# Altium PCB PCB_Sensor.PcbDoc
Units mm, origin at the board's own origin, x right, y up, seen from the top; angles counter-clockwise.
Board outline 62.23 x 33.15 mm, 2 copper layers (Top Layer, Bottom Layer); 57 components, 39 nets, 206 pads, 21 vias.
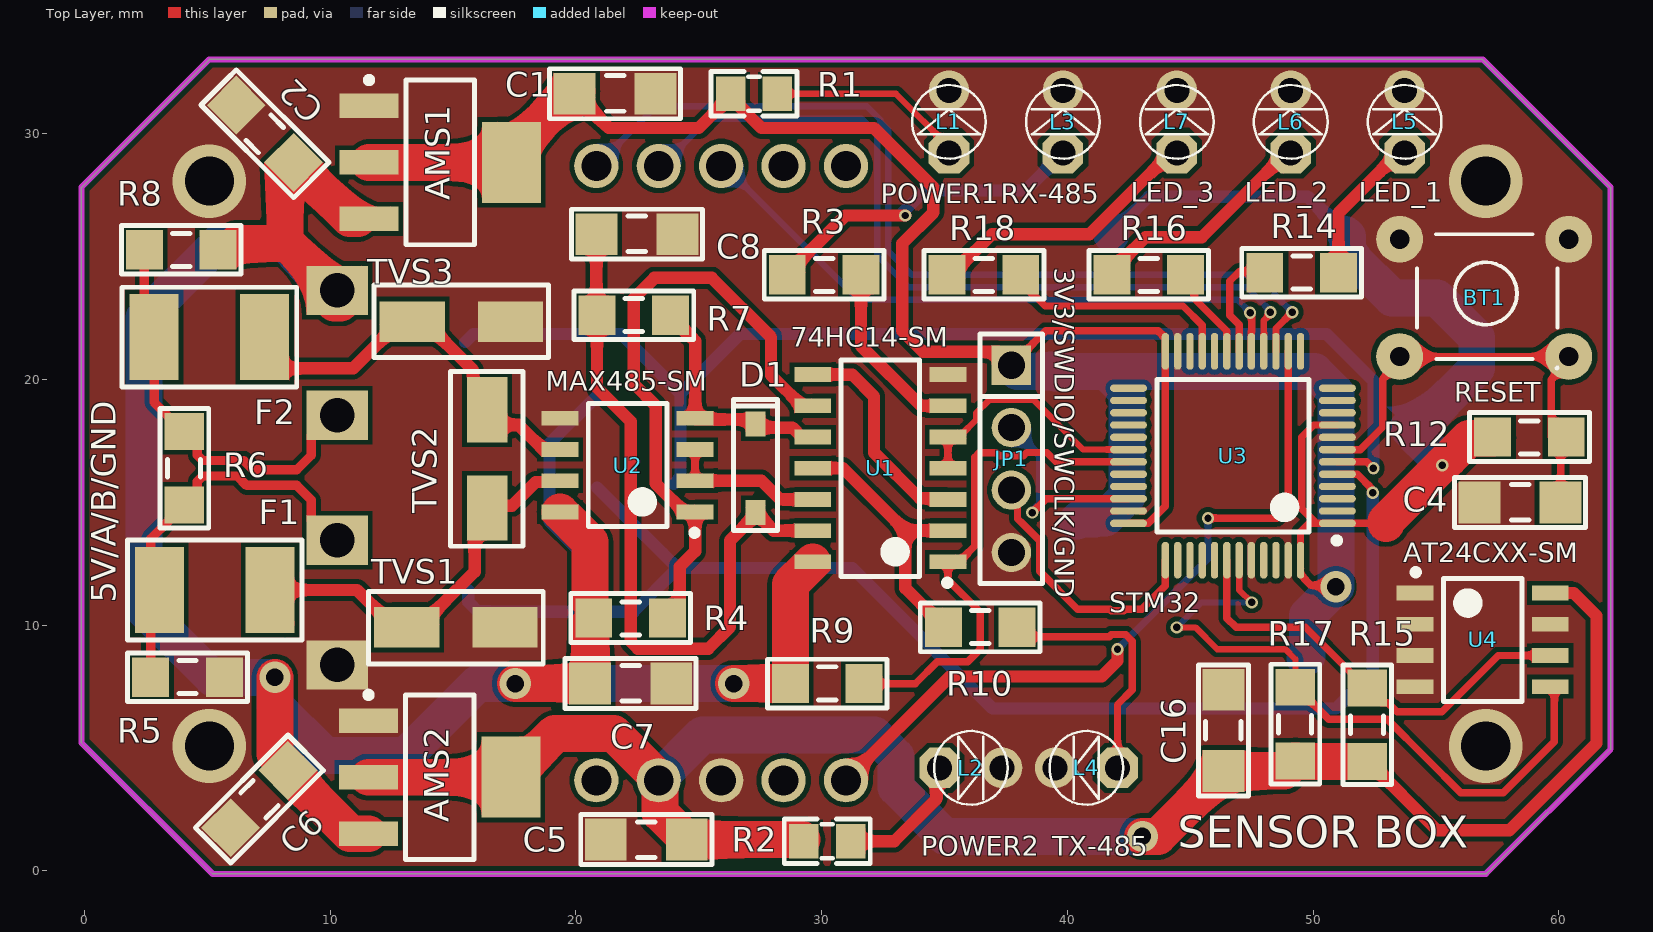
[diagram p0: Top Layer view]
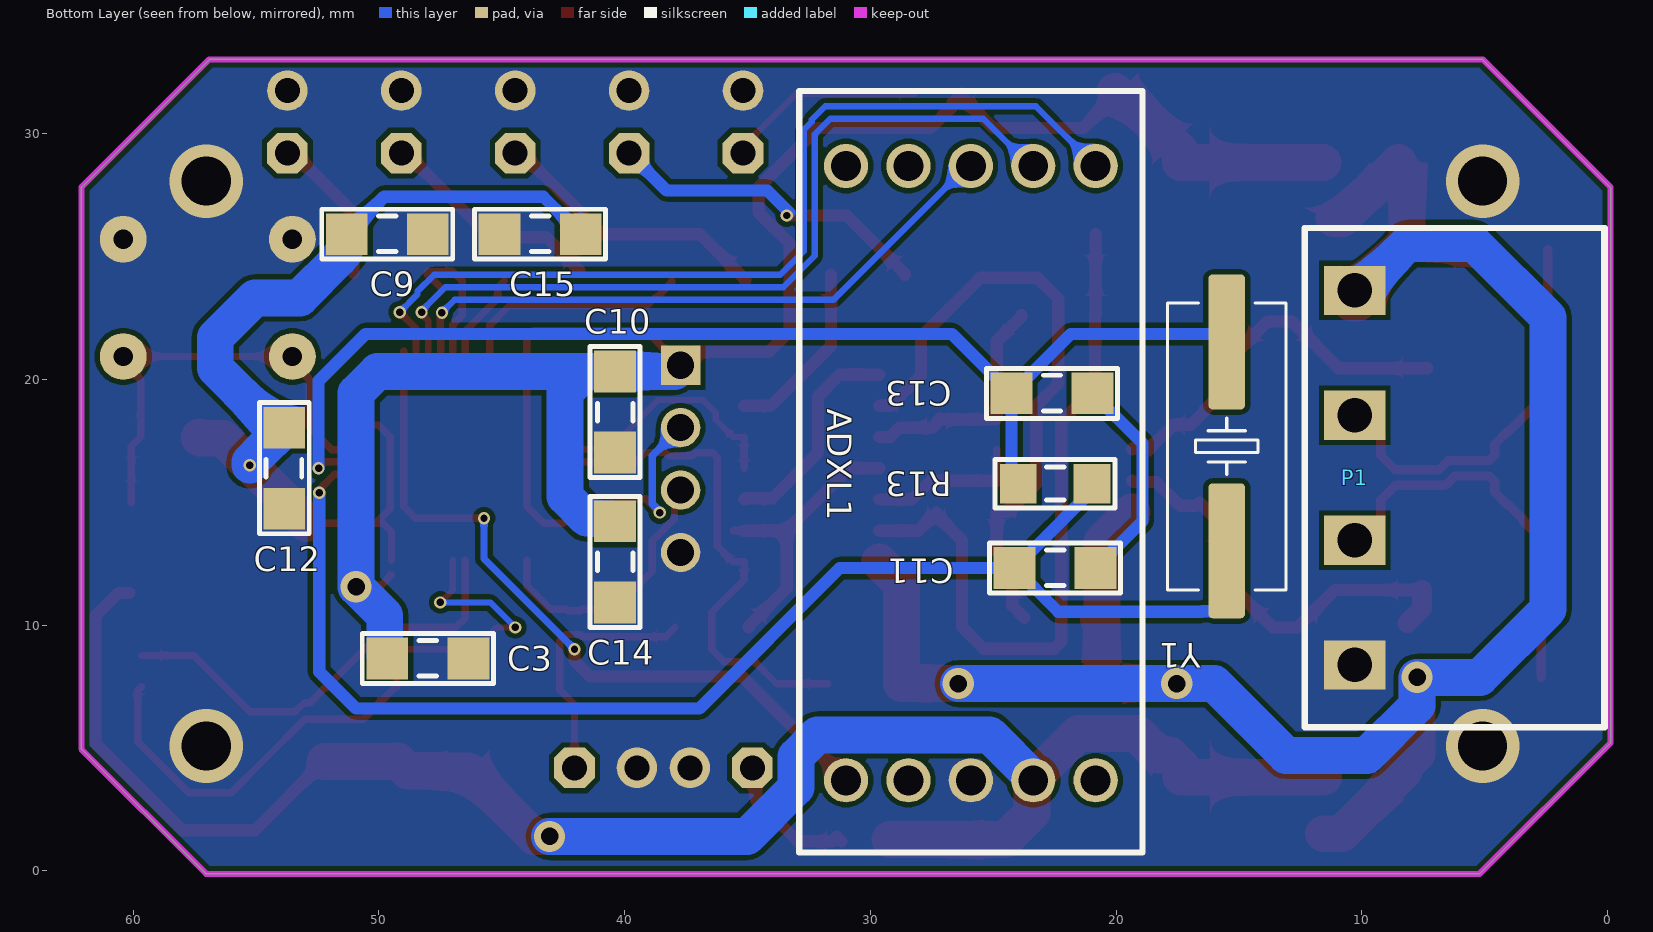
[diagram p1: Bottom Layer view, seen from below]

## Layer stack, top to bottom
Top Solder: solder mask 0.0102, Solder Resist, Dk 3.5
Top Layer: signal copper 0.0356
Dielectric 1: dielectric 0.32, FR-4, Dk 4.8
Bottom Layer: signal copper 0.0356
Bottom Solder: solder mask 0.0102, Solder Resist, Dk 3.5

## Board outline
-0.127,5.207 -0.127,27.813 5.08,33.02 56.896,33.02 62.103,27.813 62.103,4.953 57.023,-0.127 5.207,-0.127

## Design rules (kind name [scope] priority, off if disabled: settings)
Clearance Clearance_1 [All] p1: gap=0.2 ignorepadtopadclearanceinfootprint=FALSE
DiffPairsRouting [All] p1: maxlimit=0.254 minlimit=0.254 mostfreqgap=0.254 toplayer_minwidth=0.381 toplayer_maxwidth=0.381 toplayer_prefwidth=0.381 bottomlayer_minwidth=0.381 bottomlayer_maxwidth=0.381 bottomlayer_prefwidth=0.381 maxuncoupledlength=12.7
PlaneConnect [All] p1: planeconnectstyle=Direct reliefexpansion=0.508 reliefentries=4 reliefconductorwidth=0.254 reliefairgap=0.254
PolygonConnect [All] p1: connectstyle=Direct reliefconductorwidth=0.254 reliefentries=4 polygonreliefangle="90 Angle" airgapwidth=0.254
RoutingVias [All] p1: holewidth=0.5 width=0.8 viastyle="Through Hole" minholewidth=0.254 minwidth=0.5 maxholewidth=0.8 maxwidth=5
SolderMaskExpansion [All] p1: expansion=0.102 istentingtop=FALSE useseparateexpansions=TRUE expansionbottom=0.102 istentingbottom=FALSE
Width [InNetClass('All Nets')] p1: maxlimit=1.5 minlimit=0.254 preferedwidth=0.5
28 further rules are at their usual default settings.

## Classes and differential pairs
differential pair RS485: +RS485_P -RS485_N

## Components (designator, comment, footprint, x,y, rotation, side; value= is the part's Value field where it differs from the comment)
ADXL1 "TYPE2" ADXL345_TYPE_2 20.828,28.683 r270 bottom
AMS1 "AMS1117-3.3V" SOT223 14.478,28.829 r270 top value="AMS1117-3.3V SOT223"
AMS2 "AMS1117-3.3V" SOT223 14.457,3.81 r270 top value="AMS1117-3.3V SOT223"
BT1 "RESET" "Nut Nhan 4 Chan Cam 6x6" 53.848,25.908 r0 top
C1 "226" "tu 1206" 21.59,31.623 r0 top
C2 "226" "tu 1206" 7.342,29.996 r135 top
C3 "104" "tu 1206" 48.006,8.636 r180 bottom
C4 "105" "tu 1206" 58.42,14.986 r0 top
C5 "226" "tu 1206" 22.86,1.27 r180 top
C6 "226" "tu 1206" 7.112,2.921 r225 top
C7 "100nF" "tu 1206" 22.225,7.62 r0 top
C8 "100pF" "tu 1206" 22.479,25.908 r0 top
C9 "101" "tu 1206" 49.657,25.908 r180 bottom
C10 "104" "tu 1206" 40.386,18.669 r270 bottom
C11 "22pF" "tu 1206" 22.479,12.319 r180 bottom
C12 "104" "tu 1206" 53.848,16.383 r90 bottom
C13 "22pF" "tu 1206" 22.606,19.431 r180 bottom
C14 "104" "tu 1206" 40.386,12.573 r270 bottom
C15 "104" "tu 1206" 43.434,25.908 r180 bottom
C16 "104" "tu 1206" 46.355,5.715 r90 top
D1 "1N4148(T4)-SM" SOD123G_DO-215AD 27.305,16.383 r90 top
F1 "FUSE 1208" FUSE-CHIP-1812-SM 5.298,11.43 r180 top
F2 "FUSE 1208" FUSE-CHIP-1812-SM 5.08,21.717 r180 top
JP1 "3V3/SWDIO/SWCLK/GND" "JP 1x4 DT" 37.719,20.574 r270 top
L1 "POWER1" LED-3MM-RED 35.179,29.21 r90 top
L2 "POWER2" LED-3MM-RED 34.798,4.191 r0 top
L3 "RX-485" LED-3MM-RED 39.814,29.21 r90 top
L4 "TX-485" LED-3MM-RED 42.037,4.191 r180 top
L5 "LED_1" LED-3MM-RED 53.721,29.21 r90 top
L6 "LED_2" LED-3MM-RED 49.085,29.21 r90 top
L7 "LED_3" LED-3MM-RED 44.45,29.21 r90 top
P1 "5V/A/B/GND" "CON 4 4EDG5.08" 10.287,23.622 r270 bottom
R1 "220" "tro smd 0805" 27.248,31.562 r180 top
R2 "220" "tro smd 0805" 30.226,1.143 r180 top
R3 "1k" "tro smd 1206" 30.099,24.257 r180 top
R4 "4.7k" "tro smd 1206" 22.225,10.287 r180 top
R5 "4.7k" "tro smd 1206" 4.191,7.874 r0 top
R6 "120" "tro smd 1206" 4.064,16.383 r90 top
R7 "56k" "tro smd 1206" 22.352,22.606 r0 top
R8 "4.7k" "tro smd 1206" 3.937,25.273 r180 top
R9 "4.7k" "tro smd 1206" 30.226,7.62 r0 top
R10 "1k" "tro smd 1206" 36.449,9.906 r0 top
R12 "10k" "tro smd 1206" 58.801,17.653 r180 top
R13 "1M" "tro smd 1206" 22.479,15.748 r180 bottom
R14 "330R" "tro smd 1206" 49.53,24.334 r0 top
R15 "4.7k" "tro smd 1206" 52.197,5.945 r90 top
R16 "330R" "tro smd 1206" 43.307,24.257 r180 top
R17 "4.7k" "tro smd 1206" 49.276,5.969 r90 top
R18 "330R" "tro smd 1206" 36.6,24.257 r180 top
TVS1 "SMAJ6.5CA-SM" SMA-J_DO-214AC_TVS-BI 15.113,9.906 r0 top
TVS2 "SMAJ6.5CA-SM" SMA-J_DO-214AC_TVS-BI 16.383,16.764 r270 top
TVS3 "SMAJ6.5CA-SM" SMA-J_DO-214AC_TVS-BI 15.335,22.352 r180 top
U1 "74HC14-SM" SOIC14-1.27-150MIL 32.385,16.383 r180 top
U2 "MAX485-SM" SOIC8-1.27-150MIL 22.098,16.51 r180 top
U3 "STM32" LQFP48-0.5-7X7MM 46.736,16.891 r180 top
U4 "AT24CXX-SM" SOIC8-1.27-150MIL 56.896,9.398 r0 top
Y1 "8Mhz" "Thach Anh 2 chan SMD" 15.494,17.272 r270 bottom value=4Mhz

## Footprints (in the part's own frame and the unit in brackets; to place one, negate y for a bottom-side part, rotate by r counter-clockwise, add the part's x,y. Pads: shape width x height; smd on the part's side, far side on the other; paste and mask are expansions set on the pad)
ADXL345_TYPE_2 [mm]
  round 1.8 hole 1.219: 1(0,0) 2(0,-2.54) 3(0,-5.08) 4(0,-7.62) 5(0,-10.16) 6(25,-10.16) 7(25,-7.62) 8(25,-5.08) 9(25,-2.54) 10(25,0)
  silkscreen extent -3.05,-12.07 27.94,1.91
"CON 4 4EDG5.08" [mm]
  rect 2x2.5 hole 1.4: 1(0,0) 1(0,0) 2(5.08,0) 2(5.08,0) 3(10.16,0) 3(10.173,0) 4(15.24,0)
  silkscreen extent -2.54,-2.03 17.78,10.17, body extent -2.5,-1.75 17.74,10.25, height 3.15
FUSE-CHIP-1812-SM [mm]
  rect 2x3.5 smd: 1(-2.25,0) 2(2.25,0)
  silkscreen extent -3.56,-2.03 3.56,2.03, body extent -2.41,-1.61 2.41,1.61, height 1.32
"JP 1x4 DT" [mm] "4 pins, 1 row, straight, gold plating"
  rect 1.6x1.6 hole 1.1: 1(0,0)
  round 1.6 hole 1.1: 2(2.54,0) 3(5.08,0) 4(7.62,0)
  silkscreen extent -1.27,-1.27 8.89,1.27, body extent -1.27,-1.27 8.89,1.27, height 8.54
LED-3MM-RED [mil]
  oct 65x65 hole 40: 1(0,0)
  round 65 hole 40: 2(100,0)
  silkscreen extent -9,-59 109,59, body extent -27,-77 117,80, height 181
LQFP48-0.5-7X7MM [mm]
  oval 1.5x0.3 smd: 1(-4.25,2.75) 2(-4.25,2.25) 3(-4.25,1.75) 4(-4.25,1.25) 5(-4.25,0.75) 6(-4.25,0.25) 7(-4.25,-0.25) 8(-4.25,-0.75) 9(-4.25,-1.25) 10(-4.25,-1.75) 11(-4.25,-2.25) 12(-4.25,-2.75) 25(4.25,-2.75) 26(4.25,-2.25) 27(4.25,-1.75) 28(4.25,-1.25) 29(4.25,-0.75) 30(4.25,-0.25) 31(4.25,0.25) 32(4.25,0.75) 33(4.25,1.25) 34(4.25,1.75) 35(4.25,2.25) 36(4.25,2.75)
  oval 0.3x1.5 smd: 13(-2.75,-4.25) 14(-2.25,-4.25) 15(-1.75,-4.25) 16(-1.25,-4.25) 17(-0.75,-4.25) 18(-0.25,-4.25) 19(0.25,-4.25) 20(0.75,-4.25) 21(1.25,-4.25) 22(1.75,-4.25) 23(2.25,-4.25) 24(2.75,-4.25) 37(2.75,4.25) 38(2.25,4.25) 39(1.75,4.25) 40(1.25,4.25) 41(0.75,4.25) 42(0.25,4.25) 43(-0.25,4.25) 44(-0.75,4.25) 45(-1.25,4.25) 46(-1.75,4.25) 47(-2.25,4.25) 48(-2.75,4.25)
  silkscreen extent -4.35,-3.1 3.1,3.57, body extent -4.6,-4.6 4.6,4.6, height 1.6
"Nut Nhan 4 Chan Cam 6x6" [mil] "SW button 4pin, 250 x250 mil"
  round 75 hole 31: 1(-13,-8) 1(258,-8) 2(-13,-196) 2(258,-196)
  silkscreen extent 15,-215 240,0, body extent -31,-225 281,19, height 276
SMA-J_DO-214AC_TVS-BI [mm]
  rect 2.65x1.65 smd: 1(-2,0) 2(2,0)
  silkscreen extent -3.55,-1.49 3.56,1.46, body extent -2.8,-1.47 2.8,1.48, height 2.9
SOD123G_DO-215AD [mm]
  rect 1x0.8 smd: 1(-1.8,0) 2(1.8,0)
  silkscreen extent -2.54,-0.89 2.79,0.89, body extent -1.92,-0.85 1.93,0.85, height 1.35
SOIC8-1.27-150MIL [mm]
  rect 1.5x0.6 smd: 1(-2.75,1.905) 2(-2.75,0.635) 3(-2.75,-0.635) 4(-2.75,-1.905) 5(2.75,-1.905) 6(2.75,-0.635) 7(2.75,0.635) 8(2.75,1.905)
  silkscreen extent -2.85,-2.5 1.6,2.88, body extent -3.1,-2.5 3.1,2.5, height 1.75
SOIC14-1.27-150MIL [mm]
  rect 1.5x0.6 smd: 1(-2.75,3.81) 2(-2.75,2.54) 3(-2.75,1.27) 4(-2.75,0) 5(-2.75,-1.27) 6(-2.75,-2.54) 7(-2.75,-3.81) 8(2.75,-3.81) 9(2.75,-2.54) 10(2.75,-1.27) 11(2.75,0) 12(2.75,1.27) 13(2.75,2.54) 14(2.75,3.81)
  silkscreen extent -2.85,-4.4 1.6,4.78, body extent -3.1,-4.37 3.1,4.37, height 1.75
SOT223 [mm]
  rect 1x2.4 smd: 1(-2.3,-2.9) 2(0,-2.9) 3(2.3,-2.9)
  rect 3.3x2.4 smd: 4(0,2.9)
  silkscreen extent -3.47,-3.02 3.35,1.4, body extent -3.25,-3.56 3.25,3.4, height 1.68
"Thach Anh 2 chan SMD" [mm] "SMD Crystal HC49/US-SM package"
  round 0.508 on Mech15: 0(0,0)
  rrect25% 5.5x1.5 smd: 1(-4.25,0) 2(4.25,0)
  silkscreen extent -5.84,-2.41 5.84,2.41, body extent -6.4,-2.41 6.4,2.42, height 4.29
"tro smd 0805" [mm]
  rect 1.2x1.4 smd: 1(-0.946,-0.061) 2(0.954,-0.061)
  silkscreen extent -1.75,-0.97 1.75,0.84, body extent -1.56,-0.76 1.44,0.64, height 0.53
"tro smd 1206" [mm]
  rect 1.5x1.6 smd: 1(-1.5,0) 2(1.5,0)
  silkscreen extent -2.44,-0.99 2.44,0.99, body extent -1.6,-0.8 1.6,0.8, height 0.6
"tu 1206" [mm]
  rect 1.7x1.7 smd: 1(-1.65,0) 2(1.65,0)
  silkscreen extent -2.67,-1.02 2.67,1.02, body extent -1.57,-0.8 1.63,0.8, height 0.94

## Part data
ADXL1: library part ADXL345_TYPE_2
AMS1 AMS2: library part "AMS1117 SMD", "Dán", Chung_Loai=Dán, Don_Vi=Con, Ma_Hang=MH000596
BT1: library part "Nut Nhan 4 Chan Cam 6x6", "Nut Nhan 4 Chan 6x6mm", Ma_Hang=MH004584, Ten="Nút Nhấn 4 Chân 6x6x5MM DIP"
C1 C2 C5 C6: library part "Tu 1206 226 16V 20%", "Dán", Chung_Loai=Dán, Don_Vi=Con, Ma_Hang=MH004546, So_Chan=2, Ten_Linh_Kien="Tụ 1206 226-22uF 20% 16V"
C3 C9 C10 C12 C14 C15 C16: library part "Tu 1206 104 50V 20%", "Dán", Chung_Loai=Dán, Don_Vi=Con, Ma_Hang=MH004544, So_Chan=2, Ten_Linh_Kien="Tụ 1206 104-0.1uF 20% 50V"
C4: library part "Tu 1206 105 50V 20%", "Dán", Chung_Loai=Dán, Don_Vi=Con, Ma_Hang=MH004545, So_Chan=2, Ten_Linh_Kien="Tụ 1206 105-1uF 20% 50V"
C7 C8: library part "Tu 1206 4.7nF 50V", "Dán", Chung_Loai=Dán, Don_Vi=Con, Ma_Hang=MH007538, So_Chan=2, Ten_Linh_Kien="Tụ 1206 4.7nF 50V NPO"
C11 C13: library part "Tu 1206 22pF 50V 10%", "Dán", Chung_Loai=Dán, Don_Vi=Con, Ma_Hang=MH004547, So_Chan=2, Ten_Linh_Kien="Tụ 1206 22P 10% 50V"
D1: "Fast Switching Diode - Surface Mount"
F1 F2: library part FUSE-CHIP-SM, "Chip Fuses - Surface Mount"
JP1: library part "JP 1x4 2.54 Duc Thang", "Cắm", Chung_Loai=Cắm, Don_Vi=Con, Ma_Hang=MH000903, Ten_Linh_Kien="Jump Đơn Đực 2.54MM 1x40P Thẳng 11MM"
L1 L2 L3 L4 L5 L6 L7: library part "LED 3mm Do", "Cắm", Chung_Loai=Cắm, Don_Vi=Con, Ma_Hang=MH003892, Ten_Linh_Kien="Led 3MM Phủ Đỏ (10c)"
P1: library part "CON 4 EDG5.08", "Cắm", Chung_Loai=Cắm, Don_Vi=Con, Ma_Hang=MH000979, Ten_Linh_Kien="CON 4 2EDG5.08-4P 5.08MM ( Xanh Cong)"
R1 R2: library part "Tro 0805 5% 2.2k", "Dán", Chung_Loai=Dán, Don_Vi=Con, Ma_Hang=MH005237, So_Chan=2, Ten_Linh_Kien="Trở 0805 5% 2.2k"
R3 R10: library part "Tro 1206 1% 1k", "Dán", Chung_Loai=Dán, Don_Vi=Con, Ma_Hang=MH005880, So_Chan=2, Ten_Linh_Kien="Trở 1206 1% 1k"
R4 R5 R8 R9 R15 R17: library part "Tro 1206 5% 4.7K", "Dán", Chung_Loai=Dán, Don_Vi=Con, Ma_Hang=MH005908, So_Chan=2, Ten_Linh_Kien="Trở 1206 5% 4.7k"
R6: library part "Tro 1206 1% 220k", "Dán", Chung_Loai=Dán, Don_Vi=Con, Ma_Hang=MH005896, So_Chan=2, Ten_Linh_Kien="Trở 1206 1% 220K"
R7: library part "Tro 1206 5% 75k", "Dán", Chung_Loai=Dán, Don_Vi=Con, Ma_Hang=MH005920, So_Chan=2, Ten_Linh_Kien="Trở 1206 5% 75k"
R12: library part "Tro 1206 5% 10k", "Dán", Chung_Loai=Dán, Don_Vi=Con, Ma_Hang=MH005909, So_Chan=2, Ten_Linh_Kien="Trở 1206 5% 10K"
R13: library part "Tro 1206 5% 100K", "Dán", Chung_Loai=Dán, Don_Vi=Con, Ma_Hang=MH005921, So_Chan=2, Ten_Linh_Kien="Trở 1206 5% 100k"
R14 R16 R18: library part "Tro 1206 5% 300R", "Dán", Chung_Loai=Dán, Don_Vi=Con, Ma_Hang=MH005926, So_Chan=2, Ten_Linh_Kien="Trở 1206 5% 300R"
TVS1 TVS2 TVS3: "ESD Suppressors/TVS Diodes 6.5V Bi-Dir - Surface Mount"
U1: "Hex Inverting Schmitt Trigger - Surface Mount"
U2: "Low-Power, Slew-Rate-Limited RS-485/RS-422 Transceivers - Surface Mount"
U3: library part STM32F103C8T6-1-SM, "ARM Microcontrollers - MCU 32BIT Cortex M3 64KB 20KB RAM 2X12 ADC - Surface Mount"
U4: "Two-Wire Serial EEPROM - Surface Mount"
Y1: library part "Thach Anh 2 chan SMD", "Crystal For all Crystal 2pin."

## Via types
v1: diameter 0.5, hole 0.3, Top Layer to Bottom Layer, tented both sides, 12 vias
v2: diameter 1.27, hole 0.711, Top Layer to Bottom Layer, tented both sides, 5 vias
v3: diameter 3, hole 2, Top Layer to Bottom Layer, tented both sides, 4 vias

## Nets (pads, with @x,y where several pads share a name; then routed paths per layer and width w, separated by ;. In a path a pad name is that pad's centre, name@x,y a point inside that pad or via, vN(x,y) a via of type N, cw(c..) or ccw(c..) an arc to the next point about the centre after c; other vN are vias at no path point)
3V3_1: AMS1.2 AMS1.4 C1.1 C3.1 C9.1 C10.1 C12.2 C14.1 C15.2 JP1.1 R1.2 R12.2 U3.1 U3.9 U3.24 U3.36 U3.48 | length 130
  Top Layer w0.3: JP1.1 39.116,21.971 43.688,21.971 43.918,21.741 43.986,21.741 U3.24 43.986,14.834 43.293,14.141 U3.36 ; U3.48@49.486,12.041 49.908,11.619 50.865,11.619 v2(50.928,11.557) ; U3.48 49.486,13.799 49.828,14.141 50.121,14.141 ; U3.9 50.018,18.141 49.53,17.653 49.53,14.732 50.121,14.141 ; 52.959,14.141 U3.1 50.121,14.141
  Top Layer w0.5: C1.1 21.337,30.226 24.997,30.226 26.294,31.523 R1.2 26.644,31.273 26.644,31.141 27.051,30.734 27.051,30.721 27.546,30.226 32.131,30.226 34.544,27.813 34.544,26.797 33.274,25.527 33.274,21.971 34.121,21.124 37.169,21.124 JP1.1 ; v2(50.928,11.557) v2@51.045,11.675
  Top Layer w1.5: AMS1.2 AMS1.4 17.378,29.279 C1.1@19.468,31.369 ; C1.1 C1.1@20.04,31.723 ; 52.959,14.141 52.959,14.224 55.245,16.51 v1(55.251,16.51) 55.527,16.786 56.344,17.603 57.301,17.603 R12.2
  Bottom Layer w0.5: C15.2@41.784,26.036 41.912,26.036 43.308,27.432 49.783,27.432 C9.1
  Bottom Layer w1.5: JP1.1 37.974,20.319 C10.1 41.666,20.319 50.048,20.319 50.927,19.44 v2(50.928,11.557) ; C14.1 40.486,14.323 41.125,14.323 41.153,14.351 41.539,14.351 42.418,15.23 42.418,19.467 41.666,20.219 ; C15.2 C15.2@41.784,26.036 ; C3.1 49.756,8.736 49.756,10.385 v2(50.928,11.557) ; C9.1 51.407,25.808 51.407,25.169 51.615,24.96 51.615,24.917 53.215,23.317 55.042,23.317 56.656,21.703 56.656,20.461 54.328,18.133 53.948,18.133 C12.2 55.251,16.63 v1(55.251,16.51)
3V3_2: ADXL1.9 AMS2.2 AMS2.4 C5.1 C16.1 R2.2 R15.1 R17.1 U4.8 | length 73.6
  Top Layer w0.5: R2.2@29.205,1.27 R2.2 ; R15.1 52.247,4.445 55.041,1.651 57.985,1.651 61.526,5.192 61.526,10.381 60.604,11.303 U4.8@60.154,11.303
  Top Layer w1.5: AMS2.2 AMS2.4 17.357,4.26 17.807,4.71 18.257,4.71 19.135,5.588 21.539,5.588 23.368,3.759 ADXL1.9 23.425,3.626 23.425,2.355 C5.1 R2.2@29.205,1.27 ; v2(43.053,1.397) 43.687,1.397 C16.1 48.822,4.065 49.226,4.469 R17.1 49.326,4.469 49.35,4.445 R15.1
  Bottom Layer w1.5: ADXL1.9 23.368,3.759 25.142,5.533 32.144,5.533 33.022,4.654 33.022,3.385 35.01,1.397 v2(43.053,1.397)
5V: AMS1.3 AMS2.3 C2.1 C6.1 C7.1 P1.1 R4.2 R8.1 R9.1 U1.14 U2.8 | length 89.2
  Top Layer w1.5: R8.1 5.437,25.323 5.976,25.323 6.18,25.527 7.874,25.527 ; v2(7.747,7.874) 7.747,4.761 8.349,4.158 C6.1@8.328,4.137 ; 8.005,25.654 8.005,25.658 8.064,25.717 ; C6.1 8.279,4.04 10.809,1.51 AMS2.3 ; P1.1@9.787,23.995 8.064,25.717 ; P1.1@9.914,23.487 9.914,23.364 10.164,23.114 P1.1@10.414,23.114 ; AMS1.3@11.128,26.543 10.795,26.543 C2.1 8.509,28.688 8.155,28.334 8.155,25.808 8.064,25.717 ; v2(17.526,7.62) C7.1 20.575,7.719 20.574,7.72 20.574,10.086 20.725,10.237 R4.2@20.725,10.337 ; U2.8 20.574,13.379 R4.2@20.574,10.927 ; v2(26.416,7.62) R9.1 28.726,11.664 U1.14
  Bottom Layer w1.5: P1.1@9.954,23.437 10.139,23.622 10.287,23.622 10.037,23.622 8.132,25.527 5.426,25.527 2.413,22.514 2.413,10.642 5.181,7.874 v2(7.747,7.874) 7.747,6.731 9.779,4.699 13.081,4.699 16.002,7.62 v2(17.526,7.62) v2(26.416,7.62)
CS: ADXL1.6 U3.14 | length 30.2
  Top Layer w0.3: v1(45.72,14.351) 48.514,14.351 48.986,14.823 U3.14
  Top Layer w0.5: ADXL1.6 35.214,7.909 41.398,7.909 42.037,8.548 v1(42.037,9.017)
  Bottom Layer w0.3: v1(42.037,9.017) 45.72,12.7 v1(45.72,14.351)
GND: ADXL1.8 AMS1.1 AMS2.1 BT1.1 C1.2 C2.2 C3.2 C4.1 C5.2 C6.2 C7.2 C8.2 C9.2 C10.2 C12.1 C14.2 C15.1 C16.2 JP1.4 L1.2 L2.2 L3.2 L4.2 L5.2 L6.2 L7.2 P1.4 R5.2 TVS1.2 TVS3.1 U1.7 U2.5 U3.8 U3.23 U3.35 U3.44 U3.47 U4.1 U4.2 U4.3 U4.4 U4.7 | length 0
  Top Layer w0.254: U3.35@42.477,14.632 U3.35
  other v3: 5.08,5.08 57.023,5.08 5.08,28.067 57.023,28.067
LED1: R14.1 U3.18 | length 5.5
  Top Layer w0.3: U3.18 46.986,21.741 46.986,22.229 46.609,22.606 46.609,24.003 46.99,24.384 R14.1@48.006,24.384 ; R14.1@47.43,23.684 48.03,24.284 R14.1
LED2: R16.1 U3.19 | length 3.5
  Top Layer w0.3: R16.1@44.896,24.003 45.165,23.734 45.165,23.288 46.486,21.967 U3.19
LED3: R18.1 U3.21 | length 9.2
  Top Layer w0.3: R18.1@38.076,24.003 38.076,23.953 38.676,23.353 38.726,23.353 39.092,22.987 44.704,22.987 45.486,22.205 U3.21
MISO: ADXL1.2 U3.16 | length 33.6
  Top Layer w0.254: U3.16 47.986,22.392 48.26,22.666 v1(48.26,22.733)
  Bottom Layer w0.254: ADXL1.2 23.476,28.683 25.4,30.607 31.623,30.607 32.258,29.972 32.258,25.026 33.535,23.749 47.301,23.749 48.26,22.79 v1(48.26,22.733)
MOSI: ADXL1.3 U3.17 | length 25.5
  Top Layer w0.3: v1(47.433,22.709) 47.433,22.655 47.498,22.591 47.498,21.96 47.486,21.948 U3.17
  Bottom Layer w0.254: ADXL1.3 26.054,28.683 31.496,23.241 46.917,23.241 v1@47.389,22.768
NetC8_1: C8.1 D1.1 R7.1 U1.13 | length 29.4
  Top Layer w0.5: C8.1 20.829,22.629 R7.1 20.852,19.661 22.225,18.288 22.225,9.33 22.518,9.037 25.381,9.037 26.268,9.924 26.268,13.446 D1.1@27.305,14.483 ; D1.1 D1.1@27.305,14.483 ; U1.13 28.045,13.843 27.555,14.333 27.455,14.333 D1.1@27.305,14.483
NetC11_2: C11.2 C13.2 | length 8.7
  Bottom Layer w0.5: C11.2 18.923,14.225 18.923,17.398 C13.2
NetD1_2: D1.2 R7.2 U1.10 U2.4 | length 9.8
  Top Layer w0.5: R7.2 23.852,22.556 24.848,21.56 U2.4 24.898,18.365 27.155,18.365 27.155,18.415 27.305,18.265 D1.2 27.454,18.034 28.804,18.034 29.185,17.653 U1.10
NetF1_1: F1.1 TVS1.1 TVS2.2 U2.7 | length 17.8
  Top Layer w0.5: F1.1 11.089,11.43 12.613,9.906 TVS1.1 13.613,9.906 15.875,12.168 15.875,14.256 TVS2.2 16.605,14.986 16.732,14.859 17.399,14.859 18.365,15.825 19.298,15.825 U2.7
  Top Layer w0.8: F1.1 7.548,10.68 F1.1@8.148,10.08
NetF2_1: F2.1 TVS2.1 TVS3.2 U2.6 | length 15.6
  Top Layer w0.5: F2.1@7.33,20.447 10.93,20.447 12.835,22.352 TVS3.2 13.835,22.352 15.479,20.708 15.808,20.379 15.808,19.339 TVS2.1 16.383,18.724 16.958,18.149 17.665,18.149 18.619,17.195 19.298,17.195 U2.6
NetL1_1: L1.1 R1.1 | length 7.9
  Top Layer w0.254: R1.1 33.02,31.623 L1.1@35.179,29.464
NetL2_1: L2.1 R2.1 | length 5.7
  Top Layer w0.5: R2.1 31.365,1.397 31.365,1.361 31.522,1.204 32.954,1.204 34.671,2.921 34.671,4.064 L2.1
NetL3_1: L3.1 R3.2 | length 13.5
  Top Layer w0.5: R3.2 28.599,24.307 30.962,26.67 v1(33.401,26.67)
  Bottom Layer w0.5: v1(33.401,26.67) 33.289,26.782 34.193,27.686 38.291,27.686 L3.1
NetL4_1: L4.1 R10.2 | length 10.4
  Top Layer w0.3: R10.2 38.33,9.525 41.696,9.525 41.788,9.617 42.369,9.617 42.637,9.349 42.637,7.366 42.037,6.766 L4.1
NetL5_1: L5.1 R14.2 | length 6.1
  Top Layer w0.5: R14.2 51.03,26.773 53.467,29.21 L5.1
NetL6_1: L6.1 R16.2 | length 9.5
  Top Layer w0.5: R16.2@41.831,24.384 41.831,24.434 42.331,24.934 42.333,24.934 43.18,25.781 45.466,25.781 L6.1@49.149,29.464
NetL7_1: L7.1 R18.2 | length 11.7
  Top Layer w0.5: R18.2@35.076,24.053 36.931,25.908 40.894,25.908 L7.1@44.45,29.464 ; R18.2@35.1,24.003 R18.2@35.1,24.053
NetR3_1: R3.1 U1.6 | length 7.4
  Top Layer w0.5: R3.1 31.599,21.36 34.036,18.923 U1.6
NetR4_1: R4.1 U1.9 U2.1 | length 25.5
  Top Layer w0.5: R4.1 24.225,10.787 24.225,12.385 24.848,13.008 U2.1 24.398,14.605 23.241,15.762 23.241,18.93 22.352,19.819 22.352,23.292 23.19,24.13 25.527,24.13 27.94,21.717 27.94,20.168 29.185,18.923 U1.9
NetR10_1: R10.1 U1.2 U1.11 | length 11.7
  Top Layer w0.3: R10.1 R10.1@35.052,9.906 ; U1.2 U1.2@35.585,13.843
  Top Layer w0.5: U1.11 30.861,16.383 33.401,13.843 ; R10.1 34.949,9.956 33.401,11.504 33.401,13.843 ; U1.2 33.401,13.843
NetU1_3: U1.3 U1.8 | length 8.9
  Top Layer w0.5: U1.8 31.242,20.193 32.131,19.304 32.131,17.018 33.986,15.163 35.085,15.163 U1.3
NetU1_12: U1.12 U2.2 U2.3 | length 6.4
  Top Layer w0.3: U2.2 U2.3
  Top Layer w0.5: U2.2 27.549,15.875 28.311,15.113 U1.12
NRST: BT1.2 C4.2 R12.1 U3.7 | length 19.1
  Top Layer w0.3: U3.7 51.91,17.141 52.832,18.063 52.832,20.015 BT1.2@53.823,21.006 ; BT1.2@53.518,20.93 BT1.2@60.401,20.93 ; C4.2 60.07,17.273 59.69,17.653 59.69,19.99 BT1.2@60.706,21.006
OSCIN: C11.1 R13.2 U3.5 Y1.2 | length 54.9
  Top Layer w0.3: U3.5 51.804,16.141 52.39,15.555 52.39,15.428 v1(52.428,15.39)
  Bottom Layer w0.5: Y1.2@15.621,11.43 15.621,10.937 15.994,10.564 16.487,10.564 16.51,10.541 22.351,10.541 C11.1 ; R13.2@20.852,15.596 23.529,12.919 C11.1 ; v1(52.428,15.39) 52.428,8.105 50.927,6.604 36.957,6.604 31.242,12.319 C11.1
OSCOUT: C13.1 R13.1 U3.6 Y1.1 | length 48.8
  Top Layer w0.3: U3.6 52.183,16.641 52.441,16.383 v1(52.451,16.383)
  Bottom Layer w0.5: Y1.1 15.816,21.844 21.843,21.844 C13.1 ; R13.1 24.256,16.025 C13.1 ; v1(52.451,16.383) 52.451,19.939 50.546,21.844 26.67,21.844 24.857,20.031 C13.1
RS485_N: F2.2 P1.2 R6.2 R8.2 | length 16.6
  Top Layer w0.381: R8.2 2.437,22.11 F2.2 2.83,19.067 4.014,17.883 R6.2 4.589,17.358 4.589,16.924 4.813,16.7 6.477,16.7 6.858,16.319 8.636,16.319 9.227,16.911 9.227,17.732 10.037,18.542 P1.2@10.287,18.542
RS485_P: F1.2 P1.3 R5.1 R6.1 | length 16.1
  Top Layer w0.381: R5.1 2.691,13.51 3.454,14.273 3.454,14.323 4.014,14.883 R6.1 4.589,15.408 4.589,15.842 4.813,16.066 6.214,16.066 6.595,15.684 8.636,15.684 9.227,15.093 9.227,14.272 10.037,13.462 P1.3@10.287,13.462
  Top Layer w0.5: P1.3@10.414,12.941 P1.3@10.414,12.954
RX_485: U1.4 U1.5 U3.30 | length 10.2
  Top Layer w0.254: U1.5 35.585,17.653 36.286,18.354 36.286,18.633 36.814,19.161 38.624,19.161 40.644,17.141 U3.30
  Top Layer w0.3: U1.4 U1.5
SCL_ADXL: ADXL1.1 U3.15 | length 37.7
  Top Layer w0.3: U3.15 48.486,22.07 v1(49.149,22.733)
  Bottom Layer w0.254: ADXL1.1 23.26,31.115 31.833,31.115 32.385,30.563 32.385,30.487 32.712,30.16 32.712,25.214 33.669,24.257 47.752,24.257 48.427,23.582 48.427,23.455 v1(49.149,22.733)
SCL_AT: R15.2 U3.42 U4.6 | length 18
  Top Layer w0.3: U3.42 46.486,10.283 46.863,9.906 49.686,9.906 52.147,7.445 R15.2 52.797,6.845 53.021,6.845 53.201,6.665 53.224,6.665 53.412,6.477 55.245,6.477 57.531,8.763 U4.6
SDA: R17.2 U3.43 U4.5 | length 27.4
  Top Layer w0.254: v1(44.45,9.906) 45.212,9.906 46.101,9.017 48.873,9.017 49.276,8.614 R17.2 ; U3.43 46.995,12.632 46.995,11.425 v1(47.498,10.922)
  Top Layer w0.3: R17.2 49.326,7.469 50.63,6.165 53.017,6.165 54.61,4.572 56.007,3.175 57.734,3.175 58.873,4.314 59.817,5.258 59.817,7.343 59.667,7.493 U4.5
  Bottom Layer w0.254: v1(44.45,9.906) 45.466,10.922 v1(47.498,10.922)
SWDCLK: JP1.3 U3.37 | length 11
  Top Layer w0.3: JP1.3 37.968,15.245 37.968,14.332 38.195,14.104 38.869,13.43 38.869,12.185 40.41,10.644 41.721,10.644 41.788,10.576 42.286,10.576 42.353,10.644 43.029,10.644 43.986,11.601 U3.37
SWDIO: JP1.2 U3.34 | length 8.2
  Top Layer w0.3: v1(38.57,14.578) 39.133,15.141 U3.34
  Bottom Layer w0.3: JP1.2 38.869,16.884 38.869,14.932 38.57,14.632 v1(38.57,14.578)
TX_485: R9.2 U1.1 U3.31 | length 21
  Top Layer w0.3: R9.2 33.816,7.62 34.705,8.509 35.941,8.509 36.449,9.017 36.449,10.535 35.135,11.849 U1.1 35.585,12.573 36.235,13.223 36.235,16.842 36.411,17.018 37.109,17.018 37.243,16.884 38.195,16.884 38.336,17.025 39.162,17.025 39.546,16.641 U3.31
pads on no net: ADXL1.4 ADXL1.5 ADXL1.7 ADXL1.10 U3.2 U3.3 U3.4 U3.10 U3.11 U3.12 U3.13 U3.20 U3.22 U3.25 U3.26 U3.27 U3.28 U3.29 U3.32 U3.33 U3.38 U3.39 U3.40 U3.41 U3.45 U3.46 Y1.0

## Polygon pours and split planes (outlines as drawn)
GND on Bottom Layer "NONET_L-01_P-001" (solid, pour order 2): 56.896,33.02 62.103,27.813 62.103,4.953 57.023,-0.127 5.207,-0.127 -0.127,5.207 -0.127,27.813 5.08,33.02
GND on Top Layer "NONET_L-01_P-001" (solid, pour order 1): 62.103,27.813 56.896,33.02 5.08,33.02 -0.127,27.813 -0.127,5.207 5.207,-0.127 57.023,-0.127 62.103,4.953

## Keep-outs
Keep-Out Layer:
  the board outline again, w0.254

## Silkscreen, mask and mechanical layers (free items; w line width, h text height)
Top Overlay:
  text "SENSOR BOX" at 44.496,0.935 h1.3

## Text inside footprints (layer, text, board x,y; h text height)
ADXL1: Mechanical 1 "ADXL345 / IIC/SPI" at 27.686,21.952 h1.52 r90